# Altium PCB TabletDesign.PcbDoc (part 1 of 3)
Units mm, origin at the board's own origin, x right, y up, seen from the top; angles counter-clockwise.
Board outline 140 x 100 mm, 2 copper layers (Top Layer, Bottom Layer); 256 components, 248 nets, 1066 pads, 0 vias.
Unrouted connection lines stored in the file: 625.
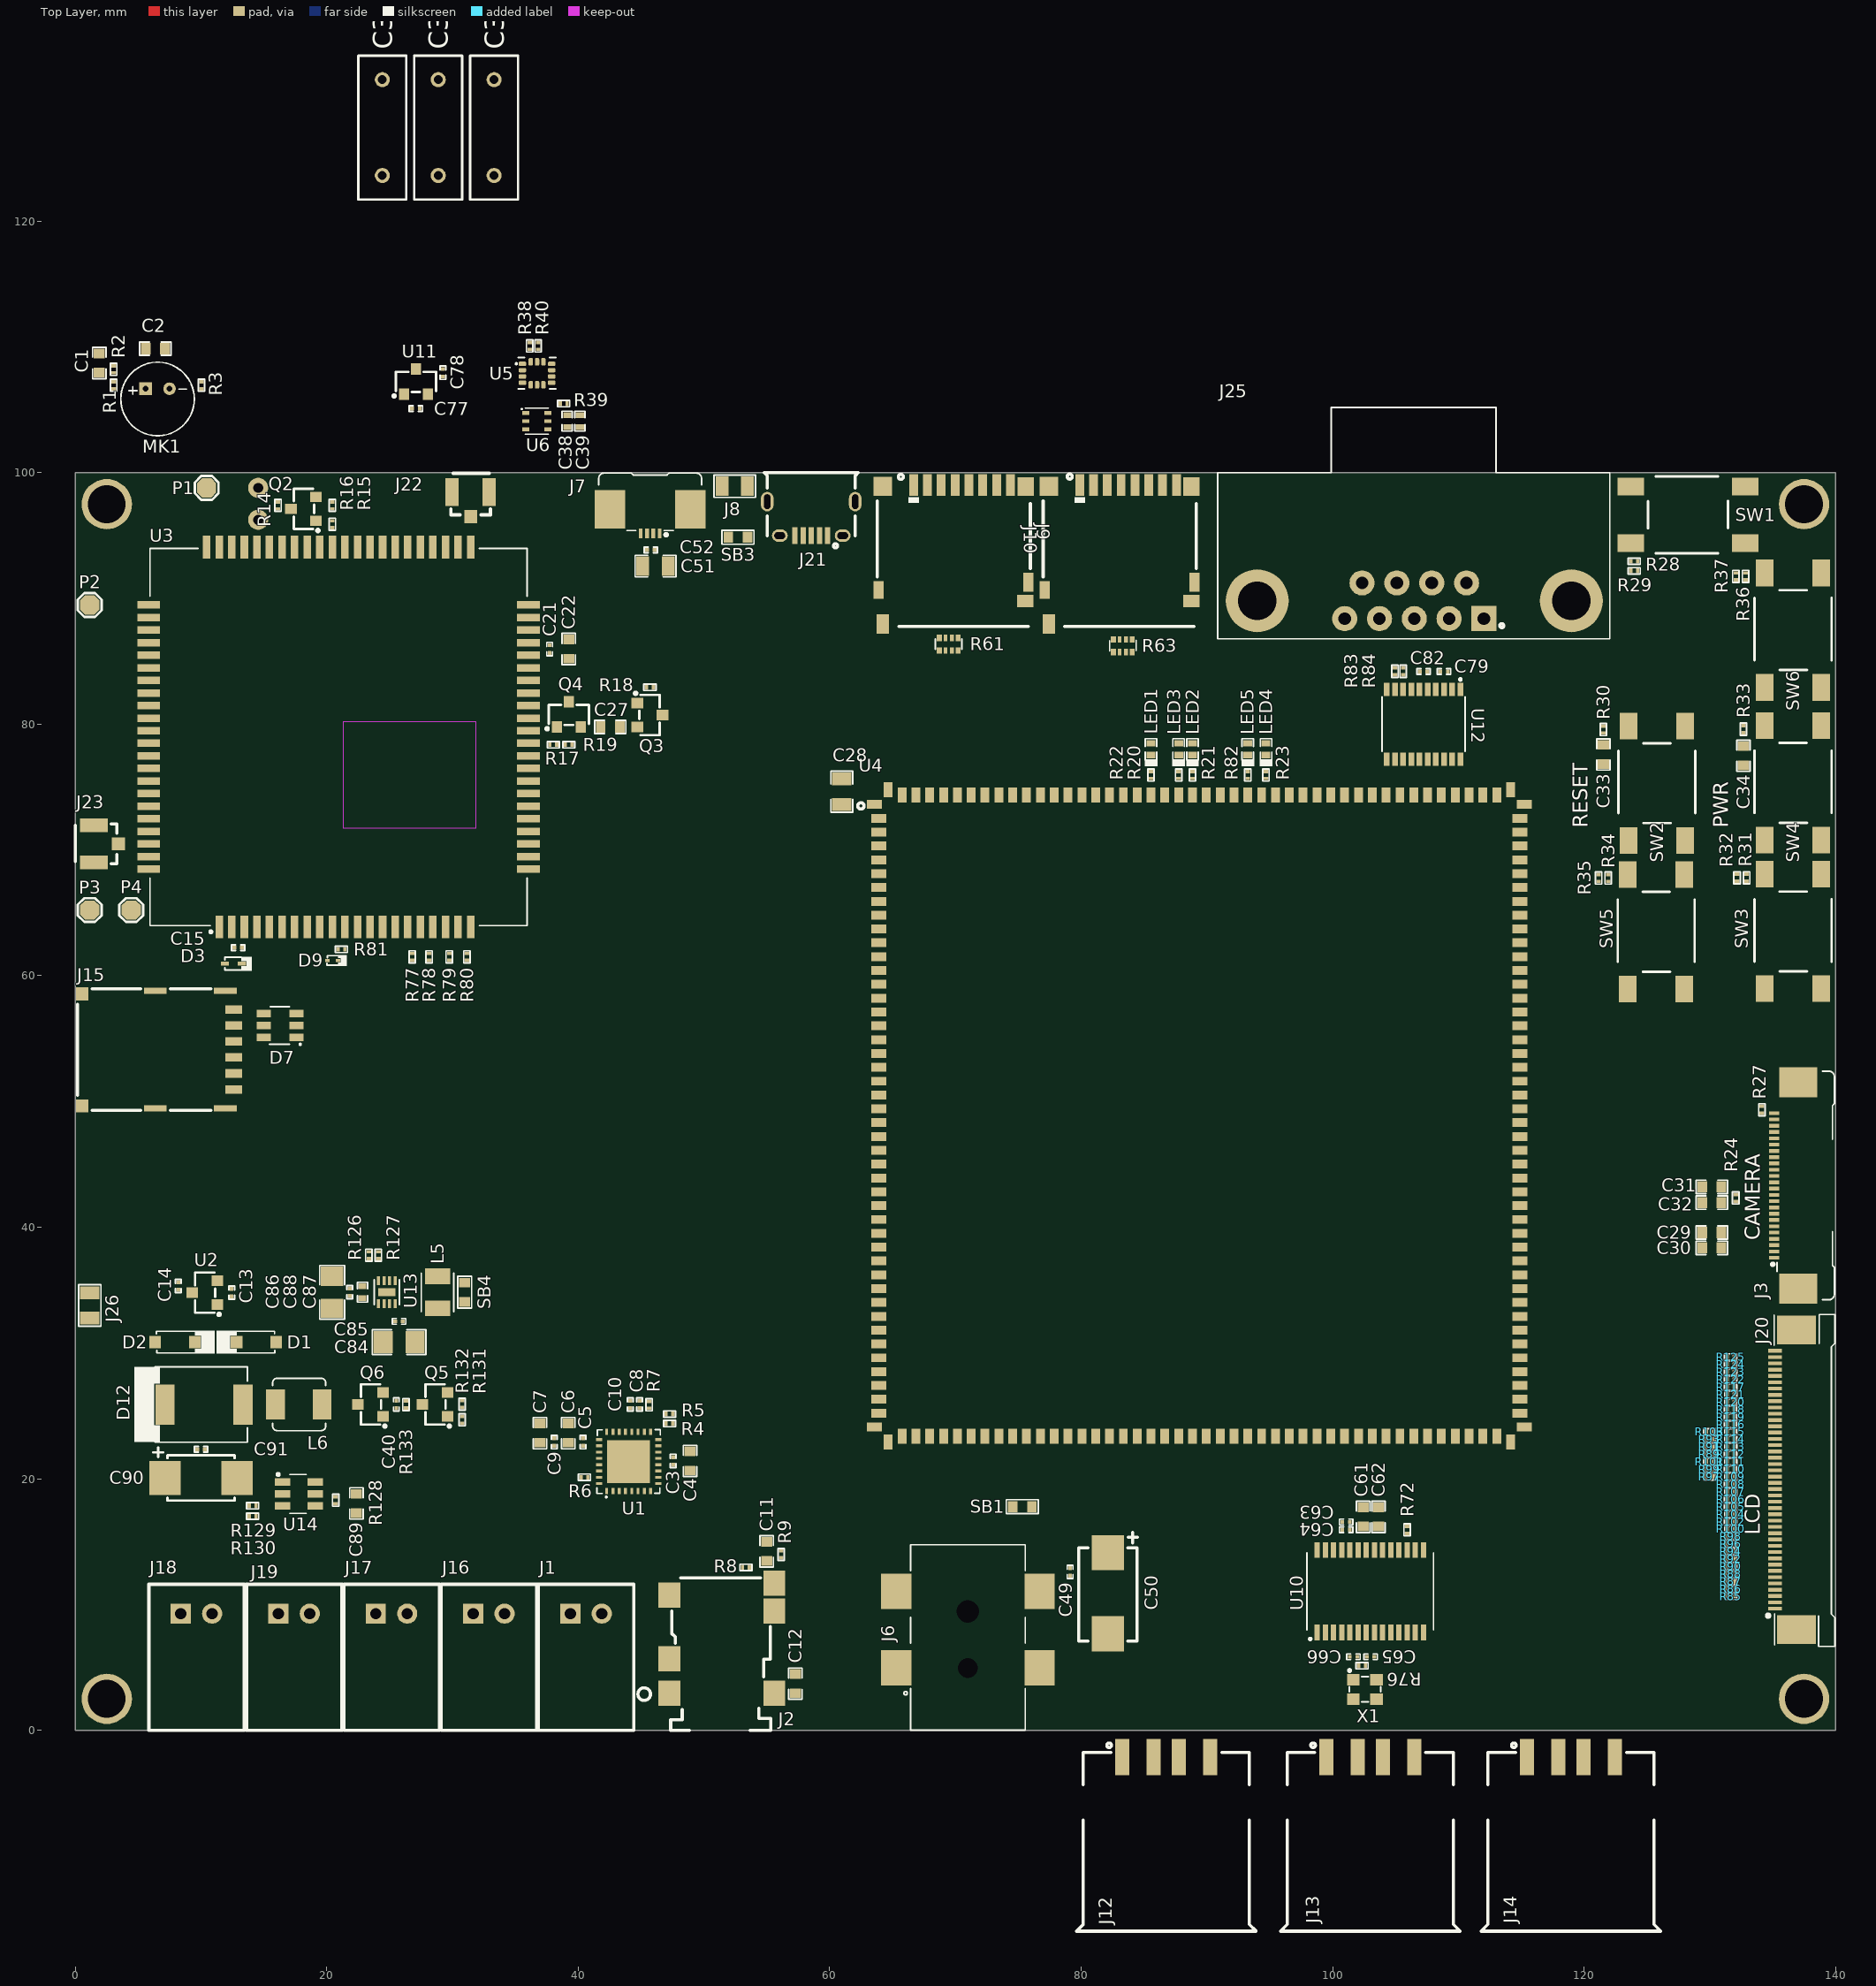
[diagram p0: Top Layer view]
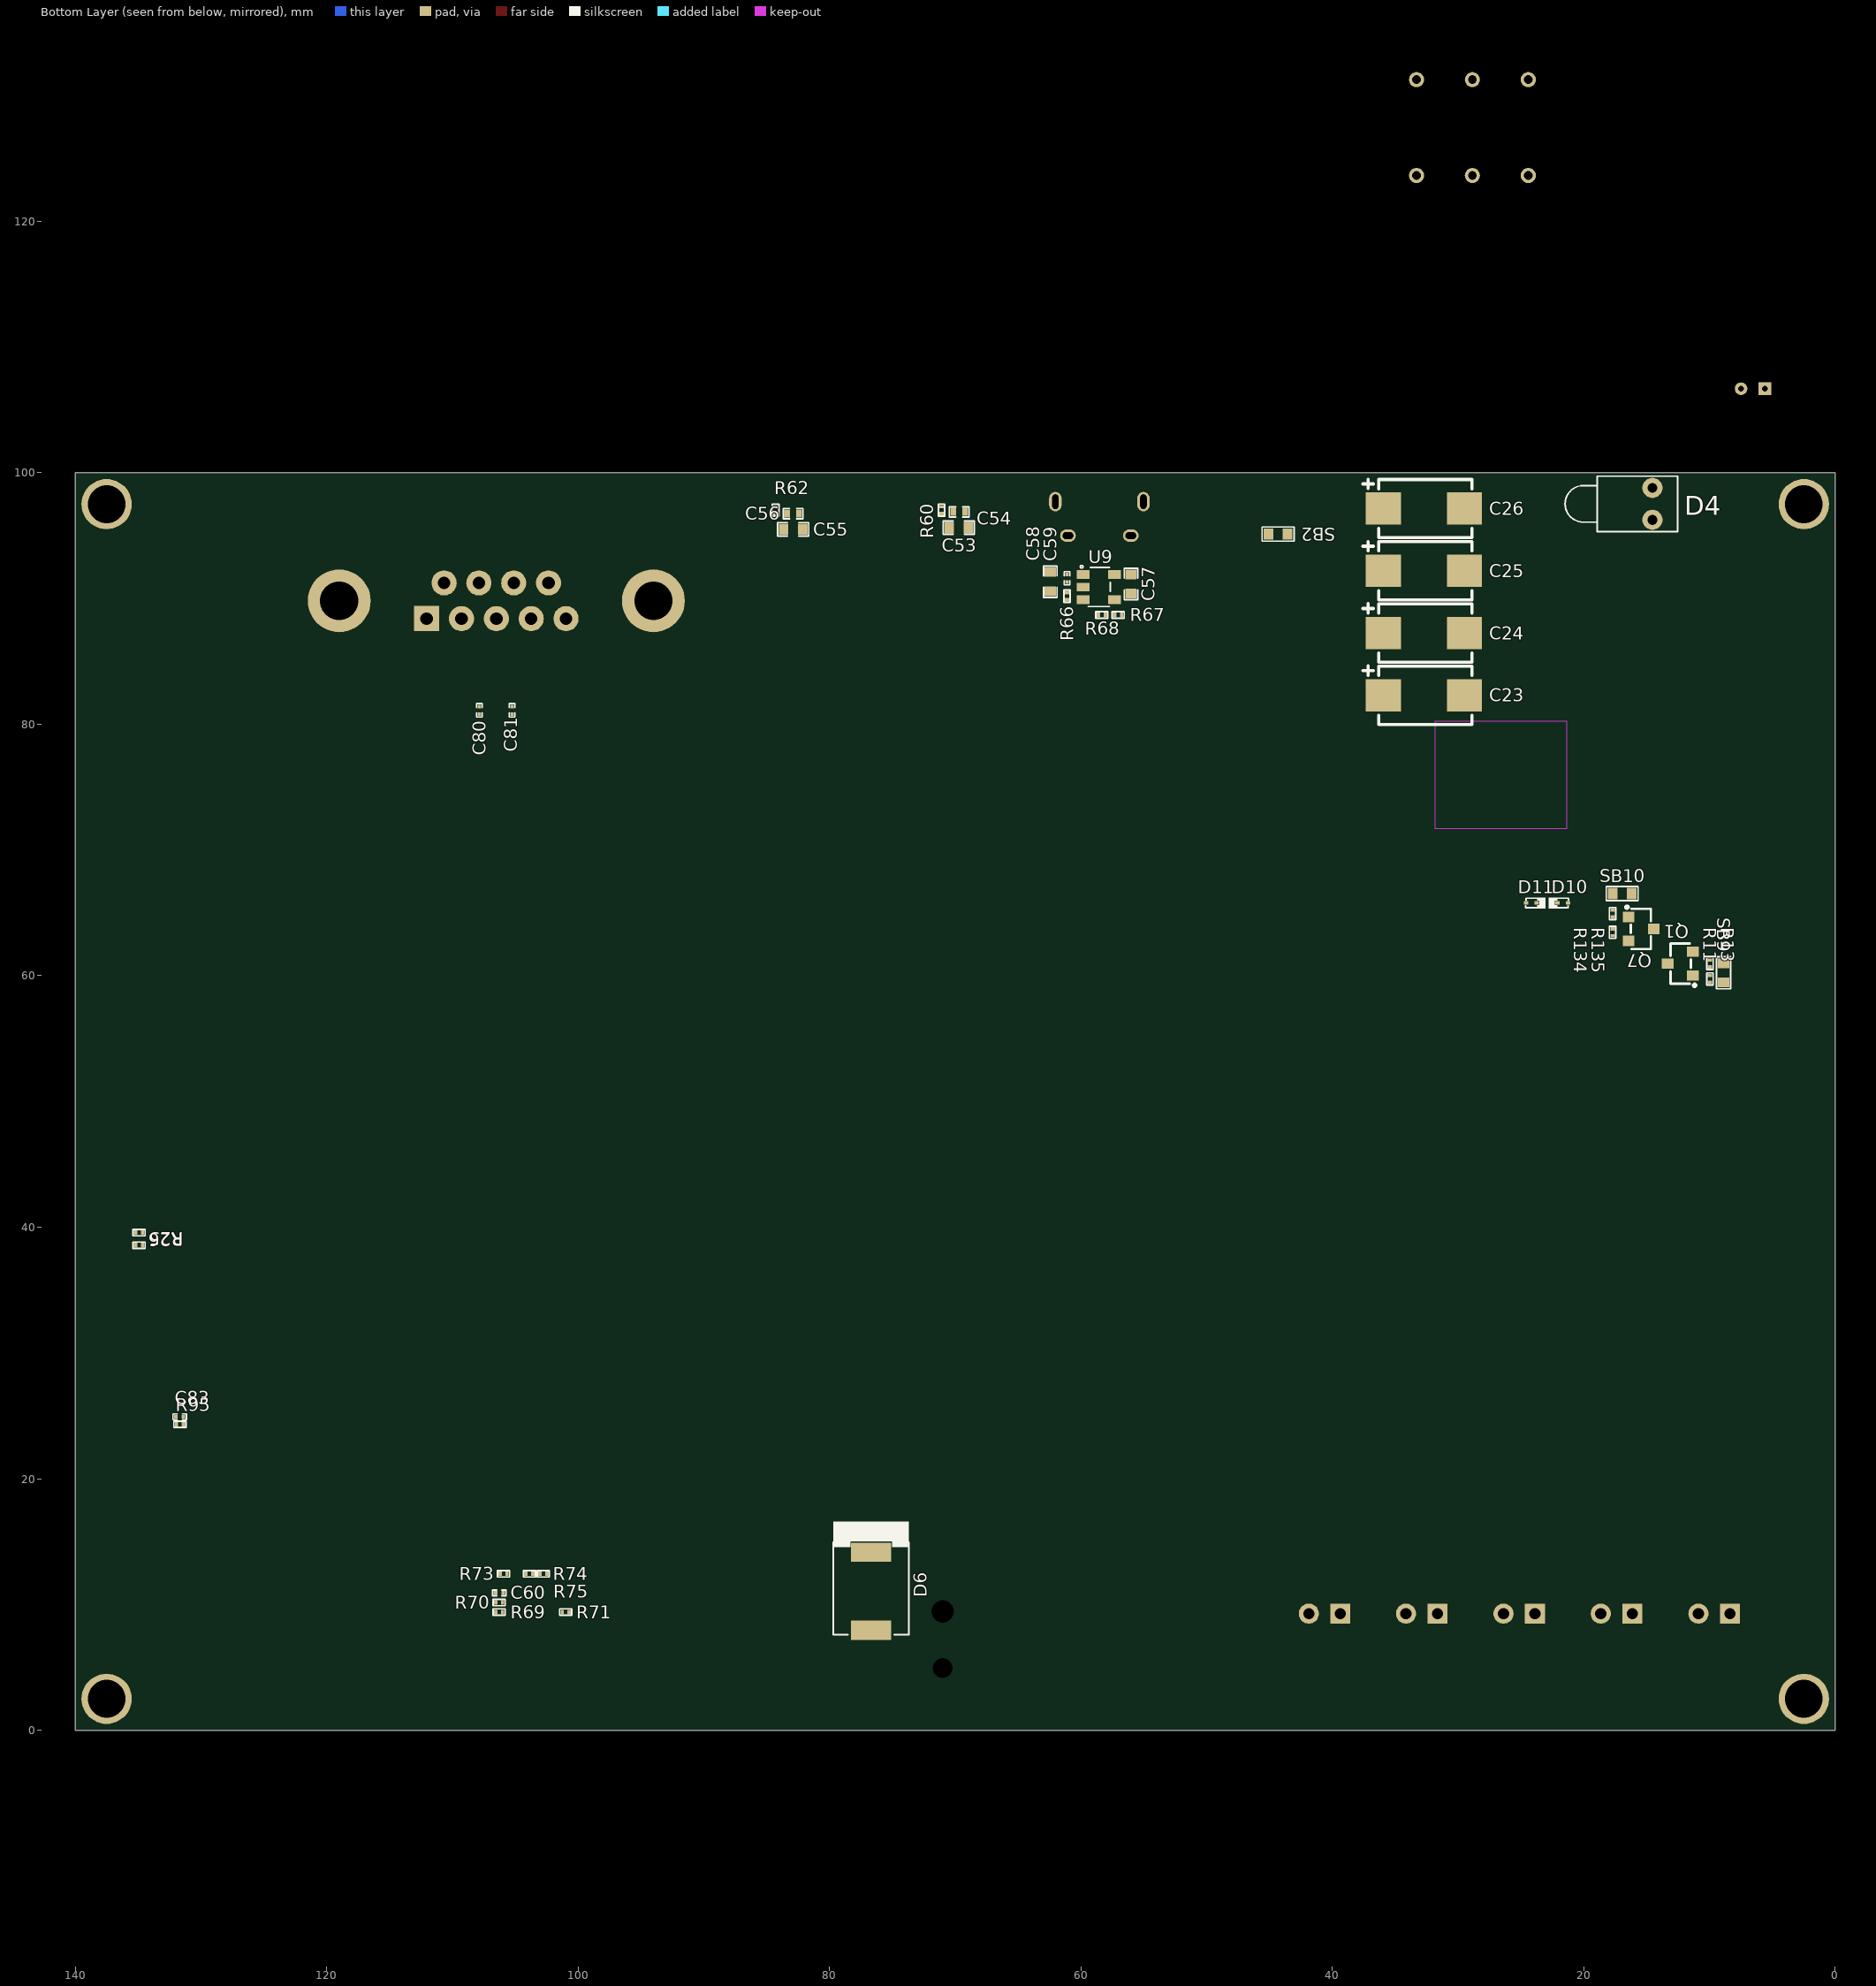
[diagram p1: Bottom Layer view, seen from below]

## Layer stack, top to bottom
Top Solder: solder mask 0.0102, Solder Resist, Dk 3.5
Top Layer: signal copper 0.0356
Dielectric 1: dielectric 0.32, FR-4, Dk 4.8
Bottom Layer: signal copper 0.0356
Bottom Solder: solder mask 0.0102, Solder Resist, Dk 3.5

## Board outline
0,0 0,100 140,100 140,0

## Design rules (kind name [scope] priority, off if disabled: settings)
Clearance [All] p1: gap=0.254 ignorepadtopadclearanceinfootprint=TRUE except(0.152: SMDPad-SMDPad)
ComponentClearance [All] p1: gap=0 collisioncheckmode=3 verticalgap=0.254 showdistances=FALSE
MinimumSolderMaskSliver [All] p1: minsoldermaskwidth=0
PolygonConnect [All] p1: connectstyle=Relief reliefconductorwidth=0.254 reliefentries=4 polygonreliefangle="90 Angle" airgapwidth=0.254
RoutingVias [All] p1: holewidth=0.3 width=0.6 viastyle="Through Hole" minholewidth=0.3 minwidth=0.6 maxholewidth=0.3 maxwidth=0.6
SilkToSilkClearance [All] p1: silktosilkclearance=0.127
SilkToSolderMaskClearance [IsPad] p1: minsilkscreentomaskgap=0 clearancetoexposedcopper=TRUE
SolderMaskExpansion [All] p1: expansion=0.102 istentingtop=FALSE
Width [All] p1: maxlimit=0.254 minlimit=0.254 preferedwidth=0.254
26 further rules are at their usual default settings.

## Classes and differential pairs
component class U_USIM_Sec: C21 C22 C23 C24 C25 C26 D7 D9 D10 D11 J15 R77 R78 R79 R80 R81
component class U_USB_Power: C40 C89 C90 C91 D12 L6 Q5 Q6 R128 R129 R130 R131 R132 R133 U14
component class U_USB_OTG: C57 C58 C59 J21 R66 R67 R68 U9
component class U_USB_Host: C60 C61 C62 C63 C64 C65 C66 J12 J13 J14 R69 R70 R71 R72 R73 R74 R75 R76 U10 X1
component class U_Sensor_Section: C35 C36 C37 C38 C39 R38 R39 R40 U5 U6
component class U_RTC_Sec: C13 C14 D1 D2 J26 U2
component class "U_RS-232 Tranceiver Section": C79 C80 C81 C82 J16 J17 J18 J19 J25 R83 R84 U12
component class U_MIC_Sec: C1 C2 MK1 R1 R2 R3
component class U_Memory_Section: C53 C54 C55 C56 J9 J10 R60 R61 R62 R63
component class U_MCU_Core_Power: C84 C85 C86 C87 C88 L5 R126 R127 SB4 U13
component class U_Main_Cont: C28 LED1 LED2 LED3 LED4 R20 R21 R22 R23 U4
component class U_Main_Cont_2: LED5 R82
component class U_Level_Shifter_Sec: C77 C78 U11
component class U_LCD_Section: C83 J20 R85 R86 R87 R88 R89 R90 R91 R92 R93 R94 R95 R96 R97 R98 R99 R100 R101 R102 R103 R104 R105 R106 R107 R108 R109 R110 R111 R112 R113 R114 R115 R116 R117 R118 R119 R120 R121 R122 R123 R124 R125
component class U_Key_Buttons: C33 C34 R28 R29 R30 R31 R32 R33 R34 R35 R36 R37 SW1 SW2 SW3 SW4 SW5 SW6
component class U_Headphones_Sec: C11 C12 J2 R8 R9
component class U_Connector_Section: C49 C50 C51 C52 D6 J6 J7 J8 SB1 SB2 SB3
component class U_Camera_Section: C29 C30 C31 C32 J3 R24 R25 R26 R27
component class U_Audio_Codec_Sec: C3 C4 C5 C6 C7 C8 C9 C10 J1 R4 R5 R6 R7 U1
component class U_3G_Modem: C15 C27 D3 D4 J22 J23 P1 P2 P3 P4 Q1 Q2 Q3 Q4 Q7 R11 R13 R14 R15 R16 R17 R18 R19 R134 R135 SB9 SB10 U3

## Components (designator, comment, footprint, x,y, rotation, side; value= is the part's Value field where it differs from the comment)
C1 "4.7uF" Cap0603 1.905,108.72 r90 top
C2 "1uF" Cap0603 6.355,109.863 r0 top
C3 "0.1uF" "CAP 0201" 47.54,21.418 r270 top
C4 "10uF" Cap0603 48.895,21.418 r270 top
C5 "0.1uF" "CAP 0201" 40.386,22.918 r90 top
C6 "10uF" Cap0603 39.207,23.629 r90 top
C7 "4.7uF" Cap0603 36.957,23.629 r90 top
C8 "0.1uF" "CAP 0201" 44.875,25.908 r270 top
C9 "0.1uF" "CAP 0201" 38.1,22.918 r90 top
C10 "0.1uF" "CAP 0201" 44.145,25.908 r270 top
C11 "4.7uF" Cap0603 54.991,14.224 r270 top
C12 "4.7uF" Cap0603 57.277,3.706 r270 top
C13 "0.1uF" "CAP 0201" 12.43,34.798 r90 top
C14 "0.1uF" "CAP 0201" 8.192,35.329 r90 top
C15 "0.1uF" "CAP 0201" 12.954,62.23 r180 top
C21 "0.1uF" "CAP 0201" 37.719,85.979 r270 top
C22 "1uF" Cap0603 39.248,85.979 r270 top
C23 "100uF" 593D107X9016D2TE3 32.721,82.296 r180 bottom
C24 "100uF" 593D107X9016D2TE3 32.721,87.249 r180 bottom
C25 "100uF" 593D107X9016D2TE3 32.721,92.202 r180 bottom
C26 "100uF" 593D107X9016D2TE3 32.721,97.155 r180 bottom
C27 "10uF" Cap0603 42.545,79.785 r0 top
C28 "22UF" Cap0805 60.96,74.634 r90 top
C29 "1uF" Cap0603 130.168,39.576 r180 top
C30 "10uF" Cap0603 130.168,38.364 r180 top
C31 "1uF" Cap0603 130.168,43.207 r180 top
C32 "10uF" Cap0603 130.168,41.958 r180 top
C33 "1uF" Cap0603 121.539,77.597 r90 top
C34 "1uF" Cap0603 132.679,77.492 r90 top
C35 "Cap" RAD-0.3 33.309,127.447 r90 top value=2.2uF
C36 "Cap" RAD-0.3 28.864,127.447 r90 top value=0.1uF
C37 "Cap" RAD-0.3 24.419,127.447 r90 top value=10nF
C38 "100pF" Cap0402 39.116,104.102 r90 top
C39 "100pF" Cap0402 40.132,104.102 r90 top
C40 "0.1uF" "CAP 0201" 25.527,25.908 r90 top
C49 "0.1uF" "CAP 0201" 79.127,12.591 r270 top
C50 "100uF" 593D107X9016D2TE3 82.134,10.897 r270 top
C51 "22UF" Cap0805 46.152,92.574 r0 top
C52 "0.1uF" "CAP 0201" 45.77,93.853 r0 top
C53 "10uF" Cap0603 69.723,95.631 r0 bottom
C54 "100pF" Cap0402 69.685,96.886 r0 bottom
C55 "10uF" Cap0603 82.893,95.504 r0 bottom
C56 "100pF" Cap0402 82.893,96.753 r0 bottom
C57 "10uF" Cap0603 56.027,91.148 r270 bottom
C58 "0.1uF" "CAP 0201" 61.107,91.61 r270 bottom
C59 "10uF" Cap0603 62.439,91.336 r270 bottom
C60 "0.1uF" "CAP 0201" 106.253,10.922 r180 bottom
C61 "10uF" Cap0603 102.433,16.97 r90 top
C62 "10uF" Cap0603 103.652,16.97 r90 top
C63 "0.1uF" "CAP 0201" 101.072,16.561 r180 top
C64 "0.1uF" "CAP 0201" 101.072,15.954 r180 top
C65 "18pF" "CAP 0201" 103.028,5.842 r180 top
C66 "18pF" "CAP 0201" 101.663,5.842 r0 top
C77 "0.1uF" "CAP 0201" 27.086,105.095 r0 top
C78 "0.1uF" "CAP 0201" 29.245,107.954 r270 top
C79 "0.1uF" "CAP 0201" 108.865,84.198 r0 top
C80 "0.1uF" "CAP 0201" 107.849,81.104 r270 bottom
C81 "0.1uF" "CAP 0201" 105.249,81.104 r270 bottom
C82 "0.1uF" "CAP 0201" 107.24,84.198 r0 top
C83 "10pF" "CAP 0201" 131.688,24.92 r0 bottom
C84 "47uF" Cap1206 25.749,30.861 r0 top
C85 "0.1uF" "CAP 0201" 25.749,32.512 r0 top
C86 "22pF" Cap0402 22.84,34.834 r90 top
C87 "47uF" Cap1206 20.427,34.834 r90 top
C88 "0.1uF" "CAP 0201" 21.824,34.834 r90 top
C89 "10uF" Cap0603 22.352,18.034 r270 top
C90 "22uF" T491C226K025AT 9.995,20.066 r0 top
C91 "0.1uF" "CAP 0201" 9.995,22.352 r0 top
D1 "1N4148W-7-F" SOD-123 14.402,30.861 r180 top
D2 "1N4148W-7-F" SOD-123 7.925,30.861 r0 top
D3 "ESDA18-1K" SOD-523 12.579,60.96 r180 top
D4 "LED1" LED-1 14.542,97.527 r0 bottom
D6 "SS34-E3/57T" SMC 76.693,11.053 r270 bottom
D7 "ESDA6V1-5SC6" SOT-23-6 16.286,56.041 r180 top
D9 "ESD9L5.0ST5G" SOD-923 20.472,61.214 r180 top
D10 "ESD9L5.0ST5G" SOD-923 21.678,65.786 r180 bottom
D11 "ESD9L5.0ST5G" SOD-923 24.162,65.786 r0 bottom
D12 "SS34-E3/57T" SMC 10.23,25.908 r0 top
J1 "S2B-XH-A(LF)(SN)" S2B-XH-A(LF)(SN) 40.62,9.271 r0 top
J2 "SJ-43504-SMT-TR" SJ-43504-SMT-TR 51.419,7.319 r180 top
J3 "0524352471" 0524352471 136.078,43.323 r90 top
J6 "DC-005-5A-2.5-SMT" DC-005-5A-2.5-SMT 70.993,4.953 r90 top value=Custom
J7 "0527460471" 0527460471 45.72,96.139 r180 top
J8 "SMD PADS" "SMD PAD" 52.451,98.933 r180 top
J9 "114-00841-68" 114-00841-68 69.85,93.5 r180 top
J10 "114-00841-68" 114-00841-68 83.058,93.5 r180 top
J12 "87583-2010BLF" 87583-2010BLF 86.775,-3.937 r0 top
J13 "87583-2010BLF" 87583-2010BLF 102.997,-3.937 r0 top
J14 "87583-2010BLF" 87583-2010BLF 118.965,-3.937 r0 top
J15 "693043020611" 693043020611 6.53,54.131 r270 top
J16 "S2B-XH-A(LF)(SN)" S2B-XH-A(LF)(SN) 32.893,9.271 r0 top
J17 "S2B-XH-A(LF)(SN)" S2B-XH-A(LF)(SN) 25.146,9.271 r0 top
J18 "S2B-XH-A(LF)(SN)" S2B-XH-A(LF)(SN) 9.632,9.271 r0 top
J19 "S2B-XH-A(LF)(SN)" S2B-XH-A(LF)(SN) 17.399,9.271 r0 top
J20 "4-1734592-2" 4-1734592-2 135.206,9.671 r90 top
J21 "10118194-0001LF" 10118194-0001LF 58.532,95 r180 top
J22 "U.FL-R-SMT-1(80)" U.FL-R-SMT-1(80) 31.442,97.443 r0 top
J23 "U.FL-R-SMT-1(80)" U.FL-R-SMT-1(80) 2.506,70.485 r90 top
J25 "A-DF 09 A/KG-T4S" "A-DF 09 A/KG-T4S" 106.5,89.82 r180 top
J26 "SMD PADS" "SMD PAD" 1.143,33.782 r90 top
L5 "1uH" LQH32PN1R0NNCL 28.809,34.834 r90 top
L6 "2.2uH" 74437324022 17.78,25.908 r0 top
LED1 "LED Blue" "LED 0402" 85.557,78.02 r270 top
LED2 "LED Blue" "LED 0402" 88.857,78.02 r270 top
LED3 "LED Blue" "LED 0402" 87.757,78.02 r270 top
LED4 "LED Blue" "LED 0402" 94.707,78.02 r270 top
LED5 "LED Blue" "LED 0402" 93.257,78.02 r270 top
MK1 "POM-2738P-R" POM-2738P-R 6.543,106.68 r0 top
P1 "Test Point" "TEST POINT" 10.442,98.797 r0 top
P2 "Test Point" "TEST POINT" 1.143,89.485 r0 top
P3 "Test Point" "TEST POINT" 1.143,65.226 r0 top
P4 "Test Point" "TEST POINT" 4.445,65.226 r180 top
Q1 "MMBT3904" SOT-23 12.331,60.968 r90 bottom
Q2 "MMBT3904" SOT-23 18.148,97.131 r90 top
Q3 "CJ2305" SOT-23 45.704,80.735 r270 top value=Custom
Q4 "MMBT3904" SOT-23 39.248,80.785 r0 top
Q5 "MMBT3904" SOT-23 28.607,25.908 r90 top
Q6 "CJ2305" SOT-23 23.479,25.908 r90 top value=Custom
Q7 "MMBT3904" SOT-23 15.428,63.726 r270 bottom
R1 "680R" Res-0201 3.048,106.955 r90 top
R2 "5.6K" Res-0201 3.048,108.225 r270 top
R3 "680R" Res-0201 10.033,106.955 r90 top
R4 "100R" Res-0201 47.265,24.384 r180 top
R5 "100R" Res-0201 47.265,25.146 r180 top
R6 "0R" Res-0201 40.492,20.118 r180 top
R7 "10K" Res-0201 45.645,25.883 r270 top
R8 "10K" Res-0201 53.34,12.954 r180 top
R9 "10K" Res-0201 56.139,13.98 r90 top
R11 "47K" Res-0201 9.971,60.968 r90 bottom
R13 "4.7K" Res-0201 9.971,59.743 r270 bottom
R14 "300R" Res-0201 16.116,97.406 r90 top
R15 "10K" Res-0201 20.442,95.906 r270 top
R16 "47K" Res-0201 20.442,97.406 r90 top
R17 "10K" Res-0201 38.023,78.372 r180 top
R18 "100K" Res-0201 45.704,82.931 r0 top
R19 "5.1K" Res-0201 39.253,78.372 r0 top
R20 "470R" Res-0201 85.557,75.967 r90 top
R21 "470R" Res-0201 88.857,75.967 r90 top
R22 "470R" Res-0201 87.757,75.967 r90 top
R23 "470R" Res-0201 94.707,75.967 r90 top
R24 "0R" Res-0201 132.067,42.327 r90 top
R25 "100R" Res-0201 134.917,39.573 r180 bottom
R26 "100R" Res-0201 134.917,38.573 r180 bottom
R27 "33R" Res-0201 134.142,49.348 r270 top
R28 "10K" Res-0201 123.995,92.964 r0 top
R29 "100R" Res-0201 123.995,92.202 r0 top
R30 "100R" Res-0201 121.539,79.586 r90 top
R31 "10K" Res-0201 132.933,67.797 r270 top
R32 "100R" Res-0201 132.171,67.797 r270 top
R33 "100R" Res-0201 132.679,79.608 r270 top
R34 "10K" Res-0201 121.92,67.775 r270 top
R35 "100R" Res-0201 121.158,67.775 r270 top
R36 "10K" Res-0201 132.842,91.756 r270 top
R37 "100R" Res-0201 132.08,91.756 r270 top
R38 "2.2K" Res-0201 36.138,110.087 r90 top
R39 "10K" Res-0201 38.841,105.499 r180 top
R40 "2.2K" Res-0201 36.807,110.087 r90 top
R60 "100R" Res-0201 71.09,97.026 r90 bottom
R61 "47K" CAY10-473J4LF 70.215,86.868 r270 top
R62 "100R" Res-0201 84.284,97.028 r90 bottom
R63 "47K" CAY10-473J4LF 84.066,86.741 r270 top
R66 "6.8K" Res-0201 61.107,90.185 r90 bottom
R67 "1K" Res-0201 57.042,88.693 r180 bottom
R68 "100K" Res-0201 58.334,88.693 r0 bottom
R69 "10K" Res-0201 106.278,9.398 r0 bottom
R70 "47K" Res-0201 106.278,10.16 r0 bottom
R71 "680R" Res-0201 100.986,9.398 r180 bottom
R72 "510K" Res-0201 105.922,15.933 r90 top
R73 "100K" Res-0201 105.922,12.446 r0 bottom
R74 "10K" Res-0201 102.768,12.446 r180 bottom
R75 "20K" Res-0201 103.861,12.446 r0 bottom
R76 "1.1M" Res-0201 102.345,5.131 r0 top
R77 "50R" Res-0201 26.797,61.5 r90 top
R78 "50R" Res-0201 28.142,61.5 r90 top
R79 "50R" Res-0201 29.742,61.5 r90 top
R80 "50R" Res-0201 31.142,61.5 r90 top
R81 "0R" Res-0201 21.167,62.103 r180 top
R82 "470R" Res-0201 93.257,75.967 r90 top
R83 "100R" Res-0201 105.615,84.213 r270 top
R84 "100R" Res-0201 104.965,84.213 r90 top
R85 "22R" Res-0201 131.666,10.65 r180 top
R86 "22R" Res-0201 131.666,11.245 r180 top
R87 "22R" Res-0201 131.666,11.839 r180 top
R88 "22R" Res-0201 131.666,12.434 r180 top
R89 "10K" Res-0201 129.994,21.947 r180 top
R90 "22R" Res-0201 131.663,13.029 r180 top
R91 "10K" Res-0201 129.994,22.542 r180 top
R92 "22R" Res-0201 131.663,13.623 r180 top
R93 "10K" Res-0201 129.994,23.137 r180 top
R94 "22R" Res-0201 131.663,14.218 r180 top
R95 "10K" Res-0201 131.663,24.326 r0 bottom
R96 "22R" Res-0201 131.666,14.812 r180 top
R97 "10K" Res-0201 129.994,20.164 r180 top
R98 "22R" Res-0201 131.666,15.407 r180 top
R99 "10K" Res-0201 129.994,20.758 r180 top
R100 "22R" Res-0201 131.666,16.002 r180 top
R101 "10K" Res-0201 129.994,21.353 r180 top
R102 "22R" Res-0201 131.663,16.596 r180 top
R103 "10K" Res-0201 129.994,23.731 r180 top
R104 "22R" Res-0201 131.666,17.191 r180 top
R105 "22R" Res-0201 131.663,17.785 r180 top
R106 "22R" Res-0201 131.663,18.38 r180 top
R107 "22R" Res-0201 131.666,18.975 r180 top
R108 "22R" Res-0201 131.663,19.569 r180 top
R109 "22R" Res-0201 131.666,20.164 r180 top
R110 "22R" Res-0201 131.663,20.758 r180 top
R111 "22R" Res-0201 131.666,21.353 r180 top
R112 "22R" Res-0201 131.663,21.947 r180 top
R113 "22R" Res-0201 131.666,22.542 r180 top
R114 "22R" Res-0201 131.666,23.137 r180 top
R115 "22R" Res-0201 131.666,23.731 r180 top
R116 "22R" Res-0201 131.663,24.326 r180 top
R117 "100R" Res-0201 131.663,27.299 r180 top
R118 "22R" Res-0201 131.663,25.515 r180 top
R119 "100R" Res-0201 131.663,24.92 r180 top
R120 "22R" Res-0201 131.666,26.11 r180 top
R121 "22R" Res-0201 131.666,26.704 r180 top
R122 "22R" Res-0201 131.663,27.893 r180 top
R123 "22R" Res-0201 131.663,28.488 r180 top
R124 "22R" Res-0201 131.663,29.083 r180 top
R125 "22R" Res-0201 131.663,29.677 r180 top
R126 "402K" Res-0201 23.348,37.778 r90 top
R127 "270K" Res-0201 24.099,37.778 r90 top
R128 "100K" Res-0201 20.701,18.288 r90 top
R129 "536K" Res-0201 14.097,17.018 r0 top
R130 "100K" Res-0201 14.097,17.846 r0 top
R131 "10K" Res-0201 30.766,24.683 r270 top
R132 "5.1K" Res-0201 30.766,25.929 r90 top
R133 "100K" Res-0201 26.289,25.908 r90 top
R134 "4.7K" Res-0201 17.714,64.951 r90 bottom
R135 "47K" Res-0201 17.714,63.451 r270 bottom
SB1 "Solder Bridge" "Solder Bridge" 75.319,17.78 r0 top
SB2 "Solder Bridge" "Solder Bridge" 44.323,95.123 r180 bottom
SB3 "Solder Bridge" "Solder Bridge" 52.705,94.869 r0 top
SB4 "Solder Bridge" "Solder Bridge" 30.968,34.834 r270 top
SB9 "Solder Bridge" "Solder Bridge" 8.89,60.23 r270 bottom
SB10 "Solder Bridge" "Solder Bridge" 16.952,66.54 r0 bottom
SW1 "Tactile Switch" TL3301NF160QG/TR 128.27,96.647 r0 top value=Custom
SW2 "Tactile Switch" TL3301NF160QG/TR 125.785,75.311 r270 top value=Custom
SW3 "Tactile Switch" TL3301NF160QG/TR 136.616,63.522 r270 top value=Custom
SW4 "Tactile Switch" TL3301NF160QG/TR 136.616,75.333 r270 top value=Custom
SW5 "Tactile Switch" TL3301NF160QG/TR 125.73,63.5 r270 top value=Custom
SW6 "Tactile Switch" TL3301NF160QG/TR 136.616,87.481 r270 top value=Custom
U1 "ALC5621" 32-QFN 44.01,21.368 r90 top value=Custom
U2 "S-1206B18-M3T1U" SOT-23 10.287,34.798 r90 top
U3 "SIM7100AS2-10671" SIM7100AS2-10671 20.942,78.985 r90 top locked
U4 "S5P4418" S5P4418 89.407,48.868 r0 top value=Custom
U5 "ICM-42688-P" ICM-42688-P 36.725,107.908 r0 top
U6 "VEML6030-GS15" 6-SMD 36.703,104.102 r0 top
U9 "SY6280AAC" SOT23-5 58.567,90.91 r180 bottom value=Custom
U10 "GL850G" SSOP-28 102.997,11.049 r90 top
U11 "S-1206B18-M3T1U" SOT-23 27.086,107.254 r0 top
U12 "SP3222EEY-L/TR" 20-TSSOP 107.24,80.007 r270 top
U13 "ETA3451D2I-T" QFN-8 24.774,34.834 r270 top value=Custom
U14 "MP3221GJ-Z" TSOT-23-6 17.78,18.796 r0 top
X1 "8Z-12.000MAAJ-T" 8Z-12.000MAAJ-T 102.578,3.251 r0 top

## Footprints (in the part's own frame and the unit in brackets; to place one, negate y for a bottom-side part, rotate by r counter-clockwise, add the part's x,y. Pads: shape width x height; smd on the part's side, far side on the other; paste and mask are expansions set on the pad)
4-1734592-2 [mm] "CONN FPC BOTTOM 42POS 0.50MM R/A"
  rect 0.3x1.1 smd: 1(0,0) 2(0.5,0) 3(1,0) 4(1.5,0) 5(2,0) 6(2.5,0) 7(3,0) 8(3.5,0) 9(4,0) 10(4.5,0) 11(5,0) 12(5.5,0) 13(6,0) 14(6.5,0) 15(7,0) 16(7.5,0) 17(8,0) 18(8.5,0) 19(9,0) 20(9.5,0) 21(10,0) 22(10.5,0) 23(11,0) 24(11.5,0) 25(12,0) 26(12.5,0) 27(13,0) 28(13.5,0) 29(14,0) 30(14.5,0) 31(15,0) 32(15.5,0) 33(16,0) 34(16.5,0) 35(17,0) 36(17.5,0) 37(18,0) 38(18.5,0) 39(19,0) 40(19.5,0) 41(20,0) 42(20.5,0)
  rect 2.3x3.1 smd: MP1(-1.67,-1.7) MP2(22.17,-1.7)
  silkscreen extent -3,-4.75 23.39,0.69, body extent -2.98,-4.76 23.45,0.35, height 2.05
6-SMD [mm]
  rect 0.55x0.3 smd: 1(-0.875,0.65) 2(-0.875,0) 3(-0.875,-0.65) 4(0.875,-0.65) 5(0.875,0) 6(0.875,0.65)
  silkscreen extent -1.23,-1.04 0.91,1.04, body extent -1,-1 1,1, height 0.83
8Z-12.000MAAJ-T [mm]
  rect 1x0.9 smd: 1(-0.925,0.775) 2(0.925,0.775) 3(0.925,-0.775) 4(-0.925,-0.775)
  silkscreen extent -1.29,-1 1.25,1.57
20-TSSOP [mm]
  rect 1.05x0.45 smd: 1(-2.775,2.925) 2(-2.775,2.275) 3(-2.775,1.625) 4(-2.775,0.975) 5(-2.775,0.325) 6(-2.775,-0.325) 7(-2.775,-0.975) 8(-2.775,-1.625) 9(-2.775,-2.275) 10(-2.775,-2.925) 11(2.775,-2.925) 12(2.775,-2.275) 13(2.775,-1.625) 14(2.775,-0.975) 15(2.775,-0.325) 16(2.775,0.325) 17(2.775,0.975) 18(2.775,1.625) 19(2.775,2.275) 20(2.775,2.925)
  silkscreen extent -3.61,-3.3 2.16,3.3, body extent -3.2,-3.25 3.2,3.25, height 1.2
32-QFN [mm] "Audio codec"
  rect 0.5x0.23 smd: 1(-2.35,1.75) 2(-2.35,1.25) 3(-2.35,0.75) 4(-2.35,0.25) 5(-2.35,-0.25) 6(-2.35,-0.75) 7(-2.35,-1.25) 8(-2.35,-1.75) 17(2.35,-1.75) 18(2.35,-1.25) 19(2.35,-0.75) 20(2.35,-0.25) 21(2.35,0.25) 22(2.35,0.75) 23(2.35,1.25) 24(2.35,1.75)
  rect 0.23x0.5 smd: 9(-1.75,-2.35) 10(-1.25,-2.35) 11(-0.75,-2.35) 12(-0.25,-2.35) 13(0.25,-2.35) 14(0.75,-2.35) 15(1.25,-2.35) 16(1.75,-2.35) 25(1.75,2.35) 26(1.25,2.35) 27(0.75,2.35) 28(0.25,2.35) 29(-0.25,2.35) 30(-0.75,2.35) 31(-1.25,2.35) 32(-1.75,2.35)
  rect 3.4x3.4 smd: 33(0,0)
  silkscreen extent -2.88,-2.51 2.54,2.51, body extent -2.5,-2.5 2.5,2.5, height 0.9
114-00841-68 [mm]
  rect 0.7x1.75 smd: 1(3.174,-5.526) 2(2.074,-5.526) 3(0.974,-5.526) 4(-0.126,-5.526) 5(-1.226,-5.526) 6(-2.326,-5.526) 7(-3.426,-5.526) 8(-4.526,-5.526)
  rect 1x1.55 smd: "#CD Switch"(5.624,5.526)
  rect 1.3x1 smd: "*CD Switch"(-5.7,3.694)
  rect 1.5x1.5 smd: MP1(5.624,-5.424)
  rect 0.8x1.4 smd: MP2(5.954,2.826)
  rect 0.8x1.5 smd: MP3(-5.954,2.196)
  rect 1.3x1.5 smd: MP4(-5.726,-5.399)
  silkscreen extent -6.11,-6.37 6.08,5.72, body extent -6.05,-5.92 5.97,5.58, height 1.47
593D107X9016D2TE3 [mm]
  rect 2.79x2.57 smd: 1(-3.22,0) 2(3.22,0)
  silkscreen extent -4.85,-2.31 3.81,2.34, body extent -3.49,-2.21 3.7,2.21, height 2.88
87583-2010BLF [mm]
  rect 1.12x2.88 smd: 1(-3.5,1.79) 2(-1,1.79) 3(1,1.79) 4(3.5,1.79)
  rect 0x0 hole 2.3 unplated: MH1(-6.57,-1.79) MH2(6.57,-1.79)
  silkscreen extent -7.14,-12.04 7.14,2.92, body extent -7.2,-12.07 7.3,2.81, height 7.74
10118194-0001LF [mm]
  rect 0.42x1.35 smd: 1(-1.3,0) 2(-0.65,0) 3(0,0) 4(0.65,0) 5(1.3,0)
  oval 1.25x1 hole 0.55 slot 0.85 at 0 deg: MH1(-2.5,0) MH2(2.5,0)
  oval 1x1.55 hole 0.5 slot 1.15 at 90 deg: MH3(-3.5,-2.7) MH4(3.5,-2.7)
  silkscreen extent -3.73,-5 3.72,0.98, body extent -4.02,-5.38 4.02,0.2, height 2.72
0524352471 [mm]
  rect 0.3x0.8 smd: 1(-5.75,0.963) 2(-5.25,0.963) 3(-4.75,0.963) 4(-4.25,0.963) 5(-3.75,0.963) 6(-3.25,0.963) 7(-2.75,0.963) 8(-2.25,0.963) 9(-1.75,0.963) 10(-1.25,0.963) 11(-0.75,0.963) 12(-0.25,0.963) 13(0.25,0.963) 14(0.75,0.963) 15(1.25,0.963) 16(1.75,0.963) 17(2.25,0.963) 18(2.75,0.963) 19(3.25,0.963) 20(3.75,0.963) 21(4.25,0.963) 22(4.75,0.963) 23(5.25,0.963) 24(5.75,0.963)
  rect 2.4x3.05 smd: MP1(-8.2,-0.962) MP2(8.2,-0.962)
  silkscreen extent -9.09,-3.84 9.09,1.16, body extent -9.3,-3.94 9.3,1.26, height 2
0527460471 [mm]
  rect 0.3x0.8 smd: 1(-0.75,0.962) 2(-0.25,0.962) 3(0.25,0.962) 4(0.75,0.962)
  rect 2.4x3.05 smd: MP1(-3.2,-0.962) MP2(3.2,-0.962)
  silkscreen extent -4.09,-3.84 4.09,1.16, body extent -4.05,-3.81 4.05,1.19, height 2
74437324022 [mm]
  rect 1.5x2.4 smd: 1(-1.85,0) 2(1.85,0)
  silkscreen extent -2.08,-2.08 2.13,2.08, body extent -2.22,-2.03 2.22,2.03, height 1.7
693043020611 [mm] "CONN SMART CARD PUSH-PULL"
  rect 0.67x1.32 smd: C1(1.9,6.07) C2(-0.64,6.07) C3(-1.91,6.07) C5(3.17,6.07) C6(0.63,6.07) C7(-3.18,6.07)
  rect 1.05x1.02 smd: MP1(-4.416,-6.019) MP6(4.484,-6.019)
  rect 0.5x1.82 smd: MP2(-4.67,-0.17) MP3(-4.67,5.4) MP4(4.67,5.4) MP5(4.67,-0.17)
  silkscreen extent -4.83,-6.35 4.83,4.24, body extent -4.75,-6.25 4.75,6.25, height 1.2
"A-DF 09 A/KG-T4S" [mm]
  rect 2x2 hole 1: 1(-5.54,1.42)
  round 2 hole 1: 2(-2.77,1.42) 3(0,1.42) 4(2.77,1.42) 5(5.54,1.42) 6(-4.155,-1.42) 7(-1.385,-1.42) 8(1.385,-1.42) 9(4.155,-1.42)
  round 5 hole 3.05: MH1(-12.495,0) MH2(12.495,0)
  silkscreen extent -15.54,-15.37 15.65,3.02, body extent -15.48,-15.33 15.58,2.96, height 12.8
Cap0402 [mil]
  rect 18x25 smd mask+2.36: 1(-18.5,0) 2(18.5,0)
  silkscreen extent -31,-16 31,16, body extent -20,-10 20,10, height 19
Cap0603 [mil]
  rect 30x35 smd mask+2.36: 1(-30,0) 2(30,0)
  silkscreen extent -49,-21 49,21, body extent -32,-16 31,16, height 34
Cap0805 [mil] "SMD 0805"
  rect 40x60 smd mask+2.76: 1(-40,0) 2(40,0)
  silkscreen extent -64,-34 64,34, body extent -39,-25 39,25, height 30
Cap1206 [mil] "SMD 1206"
  rect 60x70 smd: 1(-50,0) 2(50,0)
  silkscreen extent -84,-39 84,39, body extent -63,-31 63,32, height 39
"CAP 0201" [mm]
  rect 0.3x0.3 smd mask+0.055: 1(-0.3,0) 2(0.3,0)
  silkscreen extent -0.53,-0.23 0.53,0.23, body extent -0.3,-0.15 0.3,0.15, height 0.28
CAY10-473J4LF [mm] "RES ARRAY 4 RES 47K OHM 0804"
  rect 0.5x0.4 smd: 1(0,0) 4(0,-1.5) 5(1,-1.5) 8(1,0)
  rect 0.5x0.3 smd: 2(0,-0.5) 3(0,-1) 6(1,-1) 7(1,-0.5)
  silkscreen extent 0.08,-1.8 0.92,0.3, body extent 0,-1.74 1.02,0.27, height 0.36
DC-005-5A-2.5-SMT [mm]
  rect 2.8x2.4 smd: 1(0,5.7) 1(6.1,5.7) 2(0,-5.7) 3(6.1,-5.7)
  round 0 hole 1.6 unplated: MH1(0,0)
  round 0 hole 1.8 unplated: MH2(4.5,0)
  silkscreen extent -4.95,-4.56 9.8,5.09, body extent -4.99,-6.27 9.81,6.33, height 11.17
ICM-42688-P [mm]
  rrect50% 0.59x0.35 smd mask+0: 1(-1.165,0.75) 2(-1.165,0.25) 3(-1.165,-0.25) 4(-1.165,-0.75) 8(1.165,-0.75) 9(1.165,-0.25) 10(1.165,0.25) 11(1.165,0.75)
  rrect50% 0.35x0.59 smd mask+0: 5(-0.5,-0.915) 6(0,-0.915) 7(0.5,-0.915) 12(0.5,0.915) 13(0,0.915) 14(-0.5,0.915)
  silkscreen extent -1.69,-1.25 1.5,1.25, body extent -1.5,-1.25 1.5,1.25, height 0.89
"LED 0402" [mm] "LED BLUE CLEAR CHIP SMD"
  rect 0.5x0.7 smd: 1(-0.47,0) 2(0.47,0)
  silkscreen extent -0.84,-0.51 1.37,0.51, body extent -0.5,-0.25 0.5,0.25, height 0.5
LED-1 [mm] "LED; 2 Leads"
  round 1.6 hole 0.8: 1(0,1.27) 2(0,-1.27)
  silkscreen extent -2,-2.2 6.95,2.2
LQH32PN1R0NNCL [mm]
  rect 1.25x2 smd: 1(-1.275,0) 2(1.275,0)
  silkscreen extent -1.55,-1.3 1.52,1.3, body extent -1.6,-1.25 1.6,1.25, height 1.7
POM-2738P-R [mm]
  rect 1x1 hole 0.45: 1(-0.95,0)
  round 1 hole 0.45: 2(0.95,0)
  silkscreen extent -2.92,-3.73 2.92,2.11, body extent -3,-3.79 3,2.21, height 2.9
QFN-8 [mm]
  rect 0.7x0.25 smd: 1(-0.925,0.675) 2(-0.925,0.225) 3(-0.925,-0.225) 4(-0.925,-0.675) 5(0.925,-0.675) 6(0.925,-0.225) 7(0.925,0.225) 8(0.925,0.675)
  rect 0.64x1.37 smd: 9(0,0)
  silkscreen extent -1,-1 1,1
RAD-0.3 [mm] "Radial Cap, Thru-Hole; 2 Leads; 0.3 in Pin Spacing"
  round 1.2 hole 0.7: 1(-3.81,0) 2(3.81,0)
  silkscreen extent -5.71,-1.91 5.71,1.91
Res-0201 [mm]
  rect 0.27x0.37 smd: 1(-0.275,0) 2(0.275,0)
  silkscreen extent -0.48,-0.25 0.48,0.25, body extent -0.3,-0.15 0.3,0.15, height 0.29
S2B-XH-A(LF)(SN) [mm]
  rect 1.6x1.6 hole 0.9: 1(-1.25,0)
  round 1.6 hole 0.9: 2(1.25,0)
  silkscreen extent -3.78,-9.27 3.81,2.34, body extent -3.7,-9.21 3.7,2.29, height 6.15
S5P4418 [mm]
  rect 1.2x0.7 smd: 1(-25.856,24.75) 2(-25.5,23.65) 3(-25.5,22.55) 4(-25.5,21.45) 5(-25.5,20.35) 6(-25.5,19.25) 7(-25.5,18.15) 8(-25.5,17.05) 9(-25.5,15.95) 10(-25.5,14.85) 11(-25.5,13.75) 12(-25.5,12.65) 13(-25.5,11.55) 14(-25.5,10.45) 15(-25.5,9.35) 16(-25.5,8.25) 17(-25.5,7.15) 18(-25.5,6.05) 19(-25.5,4.95) 20(-25.5,3.85) 21(-25.5,2.75) 22(-25.5,1.65) 23(-25.5,0.55) 24(-25.5,-0.55) 25(-25.5,-1.65) 26(-25.5,-2.75) 27(-25.5,-3.85) 28(-25.5,-4.95) 29(-25.5,-6.05) 30(-25.5,-7.15) 31(-25.5,-8.25) 32(-25.5,-9.35) 33(-25.5,-10.45) 34(-25.5,-11.55) 35(-25.5,-12.65) 36(-25.5,-13.75) 37(-25.5,-14.85) 38(-25.5,-15.95) 39(-25.5,-17.05) 40(-25.5,-18.15) 41(-25.5,-19.25) 42(-25.5,-20.35) 43(-25.5,-21.45) 44(-25.5,-22.55) 45(-25.5,-23.65) 46(-25.856,-24.75) 93(25.856,-24.75) 94(25.5,-23.65) 95(25.5,-22.55) 96(25.5,-21.45) 97(25.5,-20.35) 98(25.5,-19.25) 99(25.5,-18.15) 100(25.5,-17.05) 101(25.5,-15.95) 102(25.5,-14.85) 103(25.5,-13.75) 104(25.5,-12.65) 105(25.5,-11.55) 106(25.5,-10.45) 107(25.5,-9.35) 108(25.5,-8.25) 109(25.5,-7.15) 110(25.5,-6.05) 111(25.5,-4.95) 112(25.5,-3.85) 113(25.5,-2.75) 114(25.5,-1.65) 115(25.5,-0.55) 116(25.5,0.55) 117(25.5,1.65) 118(25.5,2.75) 119(25.5,3.85) 120(25.5,4.95) 121(25.5,6.05) 122(25.5,7.15) 123(25.5,8.25) 124(25.5,9.35) 125(25.5,10.45) 126(25.5,11.55) 127(25.5,12.65) 128(25.5,13.75) 129(25.5,14.85) 130(25.5,15.95) 131(25.5,17.05) 132(25.5,18.15) 133(25.5,19.25) 134(25.5,20.35) 135(25.5,21.45) 136(25.5,22.55) 137(25.5,23.65) 138(25.856,24.75)
  rect 0.7x1.2 smd: 47(-24.75,-25.932) 48(-23.65,-25.5) 49(-22.55,-25.5) 50(-21.45,-25.5) 51(-20.35,-25.5) 52(-19.25,-25.5) 53(-18.15,-25.5) 54(-17.05,-25.5) 55(-15.95,-25.5) 56(-14.85,-25.5) 57(-13.75,-25.5) 58(-12.65,-25.5) 59(-11.55,-25.5) 60(-10.45,-25.5) 61(-9.35,-25.5) 62(-8.25,-25.5) 63(-7.15,-25.5) 64(-6.05,-25.5) 65(-4.95,-25.5) 66(-3.85,-25.5) 67(-2.75,-25.5) 68(-1.65,-25.5) 69(-0.55,-25.5) 70(0.55,-25.5) 71(1.65,-25.5) 72(2.75,-25.5) 73(3.85,-25.5) 74(4.95,-25.5) 75(6.05,-25.5) 76(7.15,-25.5) 77(8.25,-25.5) 78(9.35,-25.5) 79(10.45,-25.5) 80(11.55,-25.5) 81(12.65,-25.5) 82(13.75,-25.5) 83(14.85,-25.5) 84(15.95,-25.5) 85(17.05,-25.5) 86(18.15,-25.5) 87(19.25,-25.5) 88(20.35,-25.5) 89(21.45,-25.5) 90(22.55,-25.5) 91(23.65,-25.5) 92(24.75,-25.932) 139(24.75,25.932) 140(23.65,25.5) 141(22.55,25.5) 142(21.45,25.5) 143(20.35,25.5) 144(19.25,25.5) 145(18.15,25.5) 146(17.05,25.5) 147(15.95,25.5) 148(14.85,25.5) 149(13.75,25.5) 150(12.65,25.5) 151(11.55,25.5) 152(10.45,25.5) 153(9.35,25.5) 154(8.25,25.5) 155(7.15,25.5) 156(6.05,25.5) 157(4.95,25.5) 158(3.85,25.5) 159(2.75,25.5) 160(1.65,25.5) 161(0.55,25.5) 162(-0.55,25.5) 163(-1.65,25.5) 164(-2.75,25.5) 165(-3.85,25.5) 166(-4.95,25.5) 167(-6.05,25.5) 168(-7.15,25.5) 169(-8.25,25.5) 170(-9.35,25.5) 171(-10.45,25.5) 172(-11.55,25.5) 173(-12.65,25.5) 174(-13.75,25.5) 175(-14.85,25.5) 176(-15.95,25.5) 177(-17.05,25.5) 178(-18.15,25.5) 179(-19.25,25.5) 180(-20.35,25.5) 181(-21.45,25.5) 182(-22.55,25.5) 183(-23.65,25.5) 184(-24.75,25.932)
  silkscreen extent -27.17,24.39 -26.67,24.89, body extent -26.4,-26.4 26.4,26.4, height 2.54
SIM7100AS2-10671 [mm]
  rect 1.8x0.6 smd: 1(-15.1,9.5) 2(-15.1,8.5) 3(-15.1,7.5) 4(-15.1,6.5) 5(-15.1,5.5) 6(-15.1,4.5) 7(-15.1,3.5) 8(-15.1,2.5) 9(-15.1,1.5) 10(-15.1,0.5) 11(-15.1,-0.5) 12(-15.1,-1.5) 13(-15.1,-2.5) 14(-15.1,-3.5) 15(-15.1,-4.5) 16(-15.1,-5.5) 17(-15.1,-6.5) 18(-15.1,-7.5) 19(-15.1,-8.5) 20(-15.1,-9.5) 41(15.1,-9.5) 42(15.1,-8.5) 43(15.1,-7.5) 44(15.1,-6.5) 45(15.1,-5.5) 46(15.1,-4.5) 47(15.1,-3.5) 48(15.1,-2.5) 49(15.1,-1.5) 50(15.1,-0.5) 51(15.1,0.5) 52(15.1,1.5) 53(15.1,2.5) 54(15.1,3.5) 55(15.1,4.5) 56(15.1,5.5) 57(15.1,6.5) 58(15.1,7.5) 59(15.1,8.5) 60(15.1,9.5) 81(-15.1,-10.5) 82(15.1,-10.5) 85(15.1,10.5)
  rect 0.6x1.8 smd: 21(-9.5,-15.1) 22(-8.5,-15.1) 23(-7.5,-15.1) 24(-6.5,-15.1) 25(-5.5,-15.1) 26(-4.5,-15.1) 27(-3.5,-15.1) 28(-2.5,-15.1) 29(-1.5,-15.1) 30(-0.5,-15.1) 31(0.5,-15.1) 32(1.5,-15.1) 33(2.5,-15.1) 34(3.5,-15.1) 35(4.5,-15.1) 36(5.5,-15.1) 37(6.5,-15.1) 38(7.5,-15.1) 39(8.5,-15.1) 40(9.5,-15.1) 61(9.5,15.1) 62(8.5,15.1) 63(7.5,15.1) 64(6.5,15.1) 65(5.5,15.1) 66(4.5,15.1) 67(3.5,15.1) 68(2.5,15.1) 69(1.5,15.1) 70(0.5,15.1) 71(-0.5,15.1) 72(-1.5,15.1) 73(-2.5,15.1) 74(-3.5,15.1) 75(-4.5,15.1) 76(-5.5,15.1) 77(-6.5,15.1) 78(-7.5,15.1) 79(-8.5,15.1) 80(-9.5,15.1) 83(10.5,-15.1) 84(-10.5,-15.1) 86(-10.5,15.1) 87(10.5,15.1)
  Keep-Out Layer region: 1.25,-10.9 -7.25,-10.9 -7.25,-0.4 1.25,-0.4
  Keep-Out Layer region: 1.25,-10.9 -7.25,-10.9 -7.25,-0.4 1.25,-0.4
  silkscreen extent -15.59,-15 15,15, body extent -15,-15 15,15, height 3.17
SJ-43504-SMT-TR [mm] "CONN JACK 4COND 3.5MM SMD R/A"
  rect 1.75x2 smd: 1(4.175,4.375) 2(-4.175,-2.175) 3(4.175,1.625) 4(-4.175,4.375) 5(-4.175,-4.375) 6(4.175,-3.425)
  silkscreen extent -3.89,-4.8 6.67,7.34, body extent -4.47,-4.8 4.63,9.2, height 1.88
SMC [mm]
  rect 1.52x3.2 smd: 1(-3.105,0) 2(3.105,0)
  silkscreen extent -5.54,-3 3.45,3, body extent -3.9,-2.95 3.9,2.95, height 2.42
"SMD PAD" [mil] "SMD 0805"
  rect 40x60 smd: 1(-40,0) 2(40,0)
  silkscreen extent -65,-35 65,35
SOD-123 [mm]
  rect 0.92x0.97 smd: 1(-1.575,0) 2(1.575,0)
  silkscreen extent -1.47,-0.91 3.18,0.92, body extent -1.85,-0.8 1.85,0.8, height 1.27
SOD-523 [mm]
  rect 0.65x0.3 smd: 1(-0.675,0) 2(0.675,0)
  silkscreen extent -1.45,-0.56 0.69,0.56, body extent -0.85,-0.45 0.85,0.45, height 0.7
SOD-923 [mm]
  rect 0.36x0.27 smd: 1(-0.42,0) 2(0.42,0)
  silkscreen extent -1.12,-0.43 0.46,0.43, body extent -0.52,-0.32 0.53,0.33, height 0.43
"Solder Bridge" [mil] "Solder Bridge ON"
  rect 30x35 smd: 1(-30,0) 2(30,0)
  silkscreen extent -50,-22 50,22
SOT23-5 [mil] "SOT23-5 Package"
  rect 40x27 smd: 1(-49.21,39.37) 2(-49.21,0) 3(-49.21,-39.37) 4(49.21,-39.37) 5(49.21,39.37)
  silkscreen extent -58,-61 36,68, body extent -46,-58 53,60, height 43
SOT-23 [mm] "TRANS NPN 40V 0.6A SOT23"
  rect 0.82x0.92 smd: 1(-0.95,-1) 2(0.95,-1) 3(0,1)
  silkscreen extent -1.82,-1.23 1.6,0.76, body extent -1.5,-1.25 1.5,1.25, height 1.05
SOT-23-6 [mm] "IC BAT CHG LI-ION 1 CELL SOT23-6"
  rect 1.12x0.62 smd: 1(-1.3,0.95) 2(-1.3,0) 3(-1.3,-0.95) 4(1.3,-0.95) 5(1.3,0) 6(1.3,0.95)
  silkscreen extent -1.68,-1.5 0.86,1.57, body extent -1.4,-1.45 1.4,1.45, height 1.44
SSOP-28 [mm]
  rect 1.25x0.42 smd: 1(-3.275,4.225) 2(-3.275,3.575) 3(-3.275,2.925) 4(-3.275,2.275) 5(-3.275,1.625) 6(-3.275,0.975) 7(-3.275,0.325) 8(-3.275,-0.325) 9(-3.275,-0.975) 10(-3.275,-1.625) 11(-3.275,-2.275) 12(-3.275,-2.925) 13(-3.275,-3.575) 14(-3.275,-4.225) 15(3.275,-4.225) 16(3.275,-3.575) 17(3.275,-2.925) 18(3.275,-2.275) 19(3.275,-1.625) 20(3.275,-0.975) 21(3.275,-0.325) 22(3.275,0.325) 23(3.275,0.975) 24(3.275,1.625) 25(3.275,2.275) 26(3.275,2.925) 27(3.275,3.575) 28(3.275,4.225)
  silkscreen extent -3.84,-5.03 3.05,5.03
T491C226K025AT [mm]
  rect 2.5x2.7 smd: 1(-2.87,0) 2(2.87,0)
  silkscreen extent -3.78,-1.8 2.67,2.41, body extent -3.15,-1.75 3.15,1.75, height 2.8
"TEST POINT" [mil]
  oct 60x60 smd: 1(0,0)
  silkscreen extent -37,-37 37,37
TL3301NF160QG/TR [mm] "Tactile Switch SPST-NO Top Actuated Surface Mount"
  rect 2.12x1.42 smd: 1(-4.55,2.25) 2(4.55,2.25) 3(-4.55,-2.25) 4(4.55,-2.25)
  silkscreen extent -3.17,-3.05 3.17,3.07, body extent -5,-3 5,3, height 4.41
TSOT-23-6 [mm]
  rect 1.2x0.6 smd: 1(-1.3,0.95) 2(-1.3,0) 3(-1.3,-0.95) 3(-1.3,-0.95) 4(1.3,-0.95) 5(1.3,0) 6(1.3,0.95)
  silkscreen extent -1.73,-1.55 0.58,1.63, body extent -1.4,-1.5 1.4,1.5, height 0.86
U.FL-R-SMT-1(80) [mm]
  rect 1.02x1.07 smd: 1(0,-0.923)
  rect 1.07x2.2 smd: 2(1.475,1.025) 3(-1.475,1.025)
  silkscreen extent -1.57,-0.79 1.57,2.51, body extent -1.47,-0.69 1.53,2.41, height 1.2

## Part data
C1 C7 C11 C12: library part C1608X5R1E475M080AC, "CAP CER 4.7UF 25V X5R 0603", Case Code (Imperial)=0603, Case Code (Metric)=1608, Dielectric=X5R, Dielectric Material=Ceramic, Manufacturer=TDK, Max Operating Temperature=85°C, Min Operating Temperature=-55°C, Package Quantity=1, Supplier Part Number 1=810-C1608X5R1E475M, Tolerance=20%, Voltage Rating=25V, Capacitance=4.7uF, Case/Package=0603, ComponentLink1Description=http://www.yageo.com/NewPortal/_en/search/productDocs.jsp?YageoPartNumber=AC0603JRNPO0BN470&src-supplier=Digi-Key, ComponentLink1URL=http://www.yageo.com/NewPortal/_en/search/productDocs.jsp?YageoPartNumber=AC0603JRNPO0BN470&src-supplier=Digi-Key, ComponentLink2Description=https://www.verical.com/server-webapp/html/getDatasheet?partID=726745&src-supplier=Verical, ComponentLink2URL=https://www.verical.com/server-webapp/html/getDatasheet?partID=726745&src-supplier=Verical, Composition=Ceramic, Depth=0.8mm, Height=0.8mm, Lead Free="Lead Free", Length=1.6mm, Manufacturer Part Number=C1608X5R1E475M080AC, Mount="Surface Mount", Packaging="Tape and Reel", Pricing 1="1=0.29, 10=0.237, 100=0.142, 500=0.106, 1000=0.09, 4000=0.076, 8000=0.072, 24000=0.07, 48000=0.067 (USD)", Radiation Hardening=No, REACH SVHC="No SVHC", Stock 1=40236, Supplier 1=Mouser, Termination=SMD/SMT, Thickness=0.039inch, Voltage Rating (DC)=25V, Weight=7.1E-05oz, Width=0.031inch
C2 C22 C29 C31 C33 C34: library part CC0603KRX5R8BB105, "CAP CER 1UF 25V X5R 0603", Case Code (Imperial)=0603, Case Code (Metric)=1608, Dielectric=X5R, Manufacturer=Yageo, Max Operating Temperature=85°C, Min Operating Temperature=-55°C, Package Quantity=1, Supplier Part Number 1=311-1445-1-ND, Tolerance=10%, Voltage Rating=25V, Capacitance=1uF, Case/Package=0603, ComponentLink1Description=http://www.yageo.com/documents/recent/UPY-GPHC_X5R_4V-to-50V_25.pdf?src-supplier=Digi-Key, ComponentLink1URL=http://www.yageo.com/documents/recent/UPY-GPHC_X5R_4V-to-50V_25.pdf?src-supplier=Digi-Key, ComponentLink2Description=http://www.yageo.com/documents/recent/UPY-GPHC_X5R_4V-to-50V_12.pdf?src-supplier=Avnet+Europe, ComponentLink2URL=http://www.yageo.com/documents/recent/UPY-GPHC_X5R_4V-to-50V_12.pdf?src-supplier=Avnet+Europe, ComponentLink3Description=http://www.farnell.com/datasheets/1525783.pdf?src-supplier=Element14, ComponentLink3URL=http://www.farnell.com/datasheets/1525783.pdf?src-supplier=Element14, ComponentLink4Description=http://www.yageo.com/documents/recent/UPY-GPHC_X5R_4V-to-50V_12.pdf?src-supplier=Avnet, ComponentLink4URL=http://www.yageo.com/documents/recent/UPY-GPHC_X5R_4V-to-50V_12.pdf?src-supplier=Avnet, Depth=0.8mm, Halogen Free="Halogen Free", Height=0.8mm, Lead Free="Lead Free", Length=1.6mm, Manufacturer Part Number=CC0603KRX5R8BB105, Mount="Surface Mount", Number of Pins=2, Packaging="Tape and Reel", Pricing 1="1=0.1, 10=0.076, 100=0.0337, 500=0.0241, 1000=0.01894 (USD)", Radiation Hardening=No, REACH SVHC="No SVHC", Stock 1=459947, Supplier 1=Digi-Key, Termination=SMD/SMT, Thickness=0.035inch, Voltage Rating (DC)=25V, Width=0.031inch
C3 C5 C8 C9 C10 C13 C14 C15 C21 C40 C49 C52 C58 C60 C63 C64 C77 C78 C79 C80 C81 C82 C85 C88 C91: library part GRM033C81E104KE14D, "CAP CER 0.1UF 25V X6S 0201", Capacitance=100nF, Case Code (Imperial)=0201, Case Code (Metric)=0603, Dielectric=X6S, Manufacturer=Murata, Max Operating Temperature=105°C, Min Operating Temperature=-55°C, Package Quantity=15000, Supplier Part Number 1=490-10403-1-ND, Tolerance=10%, Voltage Rating=25V, Case/Package=0201, Category="Ceramic Capacitors", ComponentLink1Description=http://www.mouser.com/ds/2/281/c02e-2905.pdf?src-supplier=Mouser, ComponentLink1URL=http://www.mouser.com/ds/2/281/c02e-2905.pdf?src-supplier=Mouser, ComponentLink2Description=http://www.farnell.com/datasheets/2722733.pdf?src-supplier=Farnell, ComponentLink2URL=http://www.farnell.com/datasheets/2722733.pdf?src-supplier=Farnell, ComponentLink3Description=http://search.murata.co.jp/Ceramy/image/img/A01X/G101/ENG/GRM033C81E104KE14-01.pdf?src-supplier=Digi-Key, ComponentLink3URL=http://search.murata.co.jp/Ceramy/image/img/A01X/G101/ENG/GRM033C81E104KE14-01.pdf?src-supplier=Digi-Key, Height=0.3mm, Length=0.024inch, Manufacturer Part Number=GRM033C81E104KE14D, Mount="Surface Mount", Packaging="Tape and Reel", Pricing 1="1=0.10000, 10=0.05100, 50=0.02780, 100=0.02260, 500=0.01616, 1000=0.01270, 2500=0.01155, 5000=0.01063 (USD)", RoHS=Yes, RoHS Compliant=Yes, Stock 1=91, Supplier 1=Digi-Key, Termination=SMD/SMT, Thickness=0.013inch, Voltage Rating (DC)=25V, Weight=1.2E-05oz, Width=0.3mm
C4 C6 C27 C30 C32 C53 C55 C57 C59 C61 C62 C89: library part GRM188R6YA106MA73D, "CAP CER 10UF 35V X5R 0603", Case Code (Imperial)=0603, Case Code (Metric)=1608, Dielectric=X5R, Manufacturer=Murata, Max Operating Temperature=85°C, Min Operating Temperature=-55°C, Supplier Part Number 1=490-13248-6-ND, Tolerance=20%, Voltage Rating=35V, Capacitance=10uF, Case/Package=0603, ComponentLink1Description=http://search.murata.co.jp/Ceramy/image/img/A01X/G101/ENG/GRM188R6YA106MA73-01.pdf?src-supplier=Digi-Key, ComponentLink1URL=http://search.murata.co.jp/Ceramy/image/img/A01X/G101/ENG/GRM188R6YA106MA73-01.pdf?src-supplier=Digi-Key, ComponentLink2Description=http://search.murata.co.jp/Ceramy/image/img/A01X/G101/ENG/GRM188R6YA106MA73-01.pdf?src-supplier=Mouser, ComponentLink2URL=http://search.murata.co.jp/Ceramy/image/img/A01X/G101/ENG/GRM188R6YA106MA73-01.pdf?src-supplier=Mouser, ComponentLink3Description=https://www.murata.com/~/media/webrenewal/support/library/catalog/products/capacitor/mlcc/c02e.ashx?la=en-us&src-supplier=Digi-Key, ComponentLink3URL=https://www.murata.com/~/media/webrenewal/support/library/catalog/products/capacitor/mlcc/c02e.ashx?la=en-us&src-supplier=Digi-Key, ComponentLink4Description=http://search.murata.co.jp/Ceramy/image/img/A01X/G101/ENG/GRM188R6YA106MA73-01.pdf?src-supplier=Future+Electronics, ComponentLink4URL=http://search.murata.co.jp/Ceramy/image/img/A01X/G101/ENG/GRM188R6YA106MA73-01.pdf?src-supplier=Future+Electronics, ComponentLink5Description=http://search.murata.co.jp/Ceramy/image/img/A01X/G101/ENG/GRM188R6YA106MA73-01.pdf?src-supplier=TTI, ComponentLink5URL=http://search.murata.co.jp/Ceramy/image/img/A01X/G101/ENG/GRM188R6YA106MA73-01.pdf?src-supplier=TTI, Length=0.063inch, Manufacturer Part Number=GRM188R6YA106MA73D, Mount="Surface Mount", Packaging="Tape and Reel", Pricing 1="1=0.5, 10=0.346, 100=0.2076, 500=0.1557, 1000=0.13148 (USD)", Stock 1=11640, Supplier 1=Digi-Key, Thickness=0.039inch, Voltage Rating (DC)=35V, Width=0.031inch
C23 C24 C25 C26 C50: library part 593D107X9016D2TE3, "CAP TANT 100UF 10% 16V 2917", Case Code (Imperial)=2917, Case Code (Metric)=7343, ESR (Equivalent Series Resistance)=125mR, Leakage Current=16uA, Manufacturer="Vishay Sprague", Max Operating Temperature=125°C, Min Operating Temperature=-55°C, Package Quantity=1, Ripple Current=1.1mA, Supplier Part Number 1=718-1102-1-ND, Tolerance=20%, Voltage=16V, Capacitance=100uF, Case/Package=2917, ComponentLink1Description=http://www.vishay.com/docs/40005/593d.pdf?src-supplier=Avnet, ComponentLink1URL=http://www.vishay.com/docs/40005/593d.pdf?src-supplier=Avnet, ComponentLink2Description=http://documents.rs-components.com/techlib://itc_doclist_GB.htm?stockno=6844477&src-supplier=RSComponents, ComponentLink2URL=http://documents.rs-components.com/techlib://itc_doclist_GB.htm?stockno=6844477&src-supplier=RSComponents, ComponentLink3Description=http://www.vishay.com/docs/40005/593d.pdf?src-supplier=Avnet+Europe, ComponentLink3URL=http://www.vishay.com/docs/40005/593d.pdf?src-supplier=Avnet+Europe, ComponentLink4Description=http://www.vishay.com/docs/40005/593d.pdf?src-supplier=Digi-Key, ComponentLink4URL=http://www.vishay.com/docs/40005/593d.pdf?src-supplier=Digi-Key, ComponentLink5Description=http://www.mouser.com/ds/2/427/593d-239975.pdf?src-supplier=Mouser, ComponentLink5URL=http://www.mouser.com/ds/2/427/593d-239975.pdf?src-supplier=Mouser, ComponentLink6Description=https://www.alliedelec.com/m/d/4999163682384315a74ef22064734d6b.pdf?src-supplier=Allied+Electronics, ComponentLink6URL=https://www.alliedelec.com/m/d/4999163682384315a74ef22064734d6b.pdf?src-supplier=Allied+Electronics, Depth=4.3mm, Dissipation Factor=8%, Features="General Purpose", Height=2.8mm, Height - Seated (Max)=0.122inch, Lead Free="Lead Free", Length=7.3mm, Manufacturer Part Number=593D107X9016D2TE3, Mount="Surface Mount,PCB", Number of Pins=2, Packaging="Tape and Reel", Polarity=Polar, Pricing 1="1=0.99, 10=0.783, 100=0.5874 (USD)", Radiation Hardening=No, REACH SVHC=Unknown, Stock 1=7834, Supplier 1=Digi-Key, Termination=SMD/SMT, Voltage Rating=16V, Voltage Rating (DC)=16V, Weight=0.023634oz, Width=0.169inch
C28 C51: library part C2012X5R1E226M125AC, "CAP CER 22UF 25V X5R 0805"
C35 C36 C37: "Capacitor", LatestRevisionDate=17-Jul-2002, LatestRevisionNote="Re-released for DXP Platform.", PackageDescription="Radial Cap, Thru-Hole; 2 Leads; 0.3 in Pin Spacing", PackageReference=RAD-0.3, Published=8-Jun-2000, Publisher="Altium Limited"